# Altium PCB AmbientPro_Main_Board_V1.0.PcbDoc (part 3 of 5)
Units mm, origin at the board's own origin, x right, y up, seen from the top; angles counter-clockwise.
Board outline 100 x 100 mm, 4 copper layers (Top Layer, GND, PWR, Bottom Layer), stack 1.566 mm thick; 176 components, 124 nets, 570 pads, 283 vias.
Unrouted connection lines stored in the file: 133.
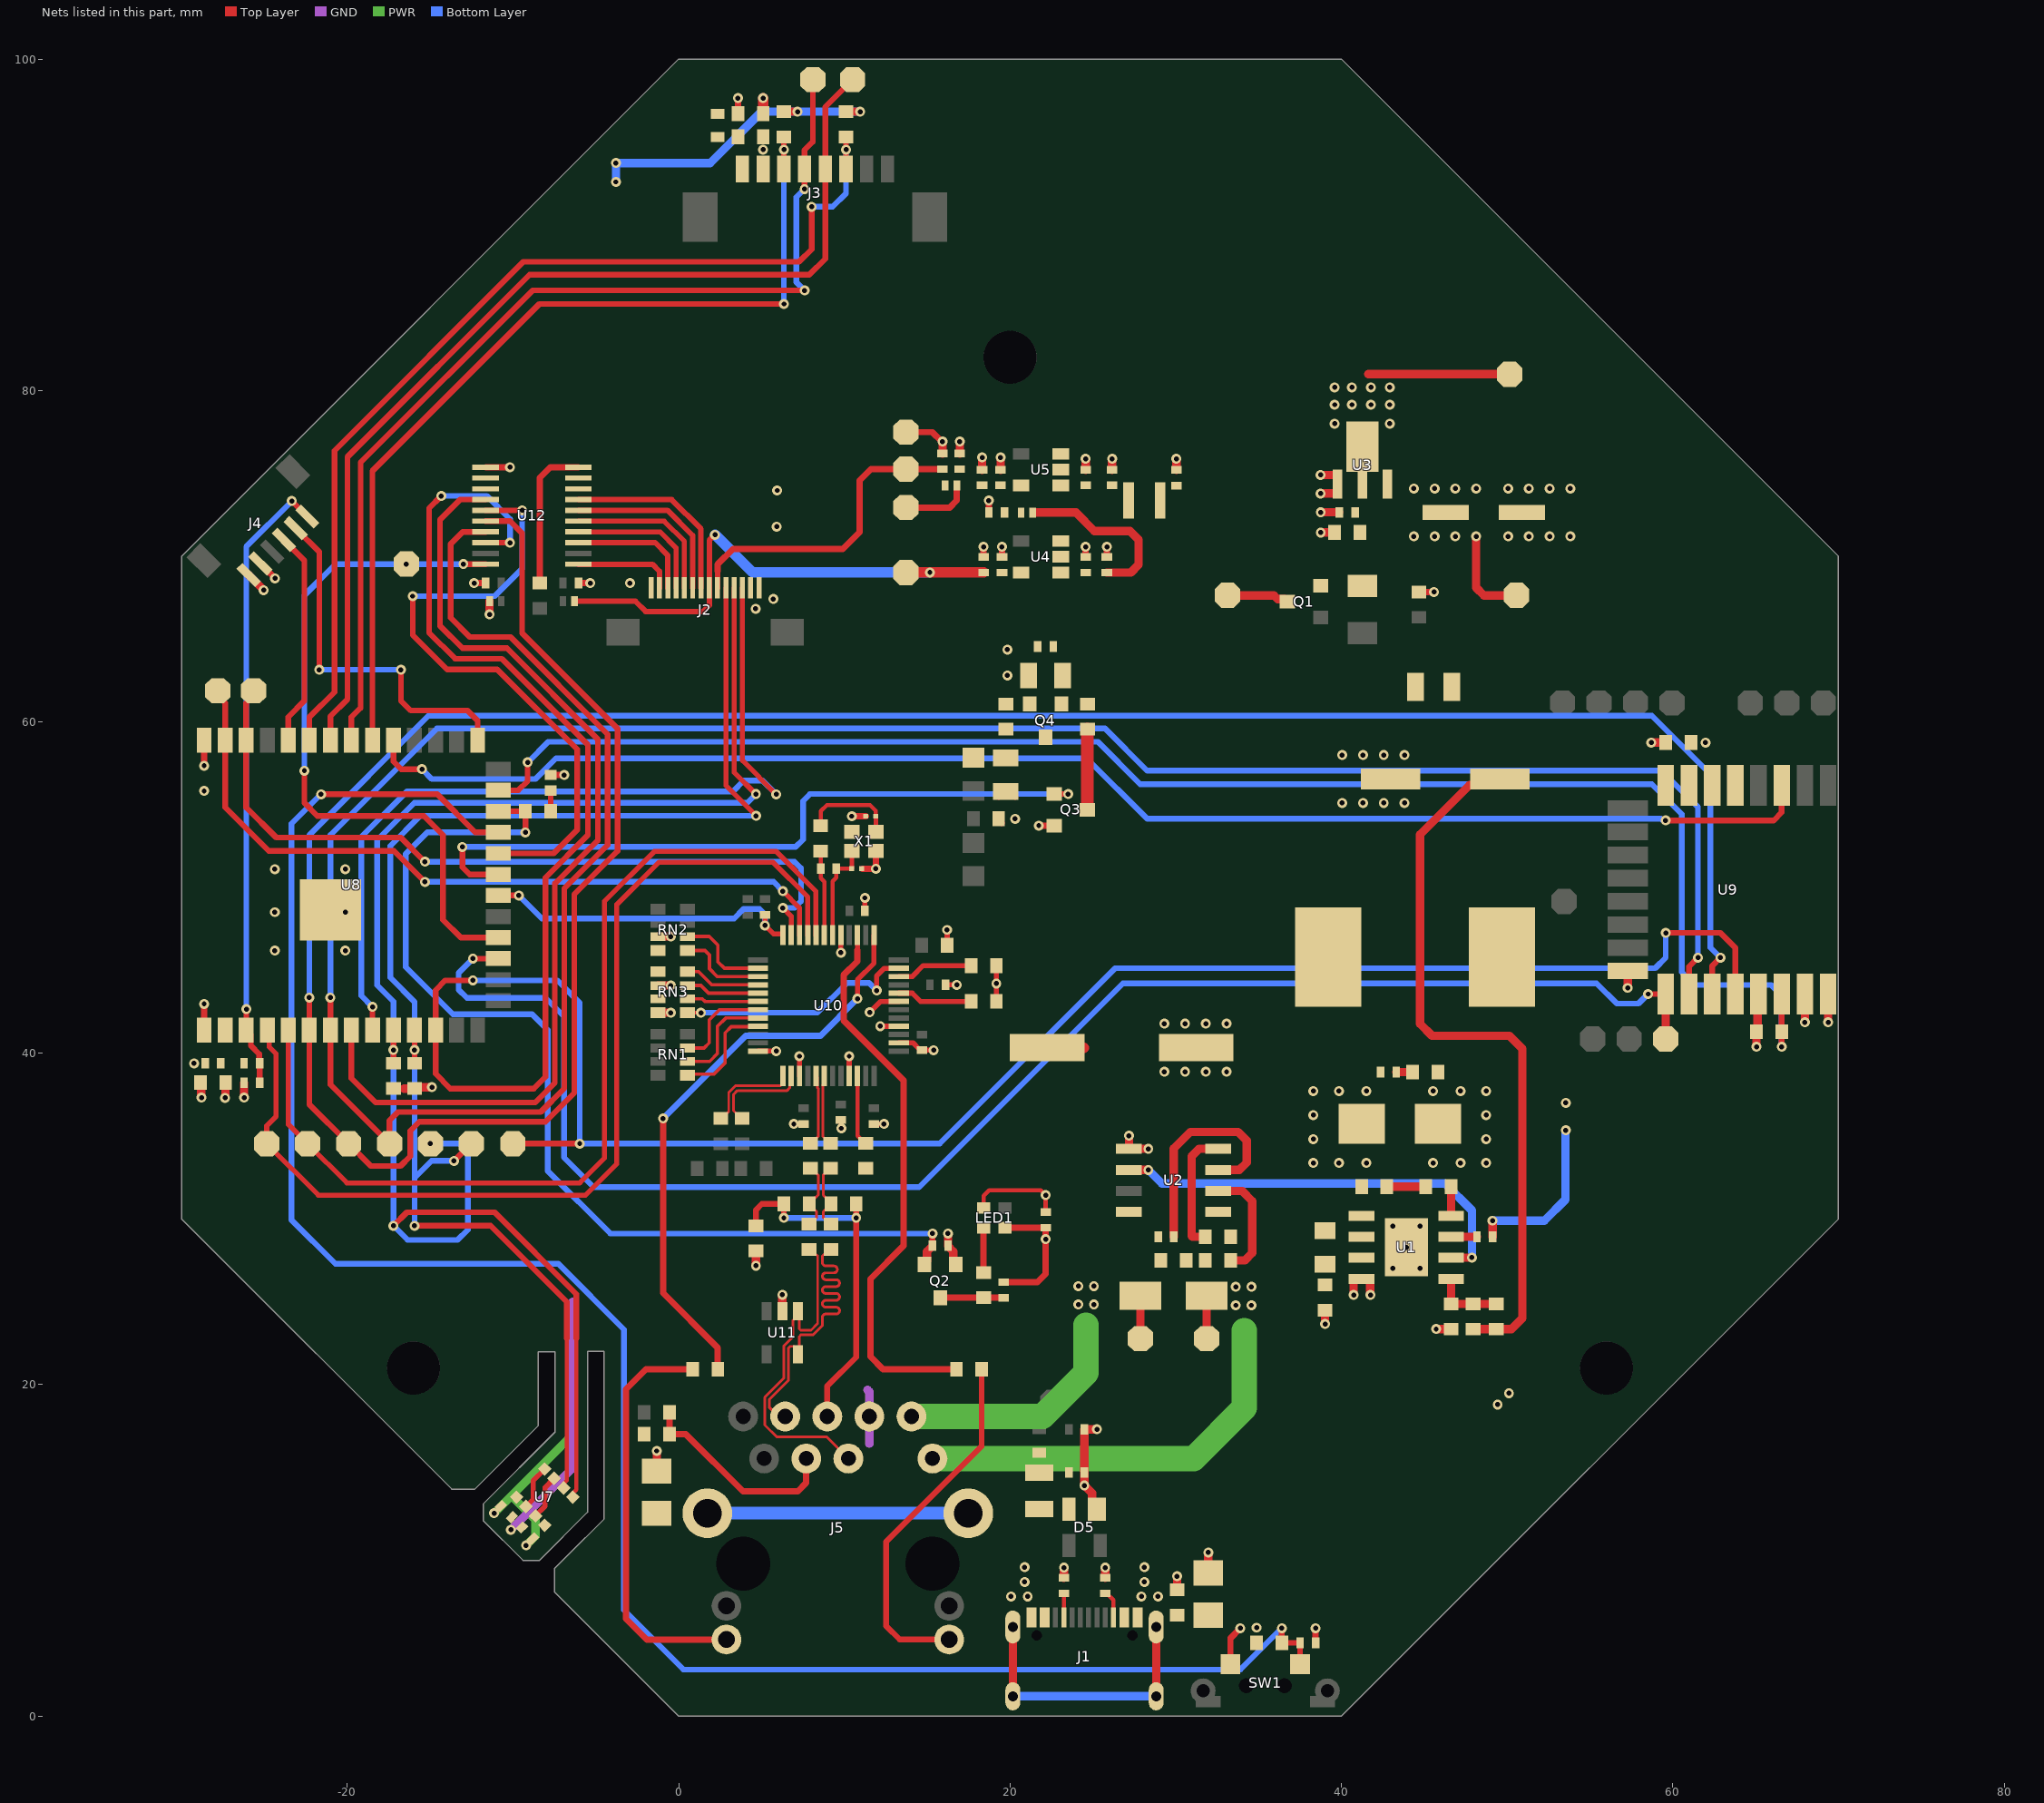
[diagram p4: the nets of this part, all layers, seen from the top]

## Part data (continued)
R9 R17 R18 R19 R27 R36 R38: library part RC0402FR-0710KL, "RES 10K OHM 1% 1/16W 0402", Case Code (Imperial)=0402, Case Code (Metric)=1005, LCSC Part Number=C60490, Manufacturer=Yageo, Max Operating Temperature=155°C, Max Power Dissipation=63mW, Min Operating Temperature=-55°C, Power Rating=62.5mW, Resistance=10kR, Resistance Tolerance=1%, Resistor Type="Thick Film", Supplier Part Number 1=603-RC0402FR-0710KL, Temperature Coefficient=100ppm/°C, Voltage Rating=50V, Case/Package=0402, Category="Chip SMD Resistors", ComponentLink1Description=https://datasheet.ciiva.com/7660/38568-7660787.pdf?src-supplier=Element14, ComponentLink1URL=https://datasheet.ciiva.com/7660/38568-7660787.pdf?src-supplier=Element14, ComponentLink2Description=https://datasheet.ciiva.com/7849/1686128-7849814.pdf?src-supplier=Element14, ComponentLink2URL=https://datasheet.ciiva.com/7849/1686128-7849814.pdf?src-supplier=Element14, ComponentLink3Description=https://datasheet.ciiva.com/7983/1018594-7983486.pdf?src-supplier=Element14, ComponentLink3URL=https://datasheet.ciiva.com/7983/1018594-7983486.pdf?src-supplier=Element14, ComponentLink4Description=https://datasheet.ciiva.com/22747/1018594-22747512.pdf?src-supplier=Element14, ComponentLink4URL=https://datasheet.ciiva.com/22747/1018594-22747512.pdf?src-supplier=Element14, ComponentLink5Description=https://datasheet.ciiva.com/12667/pyu-rc0402-51-rohs-l-6-r-12667067.pdf?src-supplier=Mouser, ComponentLink5URL=https://datasheet.ciiva.com/12667/pyu-rc0402-51-rohs-l-6-r-12667067.pdf?src-supplier=Mouser, ComponentLink6Description=https://datasheet.ciiva.com/7849/1784430-7849813.pdf?src-supplier=Element14, ComponentLink6URL=https://datasheet.ciiva.com/7849/1784430-7849813.pdf?src-supplier=Element14, ComponentLink7Description=https://datasheet.ciiva.com/7849/1784430-7849815.pdf?src-supplier=Element14, ComponentLink7URL=https://datasheet.ciiva.com/7849/1784430-7849815.pdf?src-supplier=Element14, Construction=Rectangular, Depth=0.5mm, Features="Moisture Resistant", Height=0.32mm, Item Type=Resistor, Lead Free="Lead Free", Lead Pitch=0.2mm, Length=1mm, Manufacturer Part Number=RC0402FR-0710KL, Military Standard=Not, Number of Pins=2, Number of Terminations=2, Packaging="Tape and Reel", Pricing 1="1=0.10000, 10=0.01400, 50=0.01400, 100=0.00500, 1000=0.00300, 10000=0.00200 (USD)", REACH SVHC="No SVHC", RoHS=Yes, RoHS Compliant=Yes, Series=RC, Stock 1=18648329, Supplier 1=Mouser, Termination=SMD/SMT, Tolerance=1%, Voltage Rating (DC)=50V, Width=0.5mm, Working Voltage=50V
R10 R25: library part RC0603JR-07100KL, "RES 100K OHM 5% 1/10W 0603", Case Code (Imperial)=0603, Case Code (Metric)=1608, LCSC Part Number=C100048, Manufacturer=Yageo, Max Operating Temperature=155°C, Max Power Dissipation=100mW, Min Operating Temperature=-55°C, Resistance=100kR, Resistance Tolerance=5%, Resistor Type="Thick Film", Supplier Part Number 1=311-100KGRCT-ND, Temperature Coefficient=100ppm/°C, Voltage Rating=50V, Case/Package=0603, Category="Chip SMD Resistors", ComponentLink1Description=https://datasheet.ciiva.com/7746/443971-7746424.pdf?src-supplier=Element14, ComponentLink1URL=https://datasheet.ciiva.com/7746/443971-7746424.pdf?src-supplier=Element14, ComponentLink2Description=https://datasheet.ciiva.com/7983/443971-7983686.pdf?src-supplier=Element14, ComponentLink2URL=https://datasheet.ciiva.com/7983/443971-7983686.pdf?src-supplier=Element14, ComponentLink3Description=https://datasheet.ciiva.com/7746/443971-7746423.pdf?src-supplier=Element14, ComponentLink3URL=https://datasheet.ciiva.com/7746/443971-7746423.pdf?src-supplier=Element14, ComponentLink4Description=https://datasheet.ciiva.com/8887/pyu-rc0603-51-rohs-l-4-8887903.pdf?src-supplier=Avnet, ComponentLink4URL=https://datasheet.ciiva.com/8887/pyu-rc0603-51-rohs-l-4-8887903.pdf?src-supplier=Avnet, Contact Plating=Tin,Matte, Features="Moisture Resistant", Item Type=Resistor, Lead Free="Lead Free", Manufacturer Part Number=RC0603JR-07100KL, Number of Pins=2, Number of Terminations=2, Packaging="Tape and Reel", Power Rating=100mW, Pricing 1="1=0.10000, 10=0.02000, 100=0.00800, 1000=0.00360, 2500=0.00312 (USD)", Radiation Hardening=No, REACH SVHC="No SVHC", RoHS=Yes, RoHS Compliant=Yes, Series=RC, Size Code=0603, Stock 1=1210037, Supplier 1=Digi-Key, Termination=SMD/SMT, Tolerance=5%, Voltage Rating (DC)=50V, Width=0.8mm
R11 R12: library part RC0402FR-075K1L, "RES 5.1K OHM 1% 1/16W 0402", Case Code (Imperial)=0402, Case Code (Metric)=1005, LCSC Part Number=C137973, Manufacturer=Yageo, Max Operating Temperature=155°C, Max Power Dissipation=63mW, Min Operating Temperature=-55°C, Package Quantity=1, Resistance=5.1kR, Resistance Tolerance=1%, Resistor Type="Thick Film", Temperature Coefficient=100ppm/°C, Voltage Rating=50V, Case/Package=0402, Category="Chip SMD Resistors", ComponentLink1Description=https://datasheet.ciiva.com/7983/1018594-7983519.pdf?src-supplier=Element14, ComponentLink1URL=https://datasheet.ciiva.com/7983/1018594-7983519.pdf?src-supplier=Element14, ComponentLink2Description=https://datasheet.ciiva.com/46394/1018594-46394936.pdf?src-supplier=Element14, ComponentLink2URL=https://datasheet.ciiva.com/46394/1018594-46394936.pdf?src-supplier=Element14, ComponentLink3Description=https://datasheet.ciiva.com/2453/pyu-r-int-thick-7-2453401.pdf?src-supplier=Digi-Key, ComponentLink3URL=https://datasheet.ciiva.com/2453/pyu-r-int-thick-7-2453401.pdf?src-supplier=Digi-Key, ComponentLink4Description=https://datasheet.ciiva.com/2453/pyu-r-int-thick-7-2453402.pdf?src-supplier=Digi-Key, ComponentLink4URL=https://datasheet.ciiva.com/2453/pyu-r-int-thick-7-2453402.pdf?src-supplier=Digi-Key, ComponentLink5Description=https://datasheet.ciiva.com/2453/pyu-r-int-thick-7-2453400.pdf?src-supplier=Digi-Key, ComponentLink5URL=https://datasheet.ciiva.com/2453/pyu-r-int-thick-7-2453400.pdf?src-supplier=Digi-Key, ComponentLink6Description=https://datasheet.ciiva.com/12558/pyu-rc0402-51-rohs-l-6-r-8721-12558460.pdf?src-supplier=Mouser, ComponentLink6URL=https://datasheet.ciiva.com/12558/pyu-rc0402-51-rohs-l-6-r-8721-12558460.pdf?src-supplier=Mouser, ComponentLink7Description=https://datasheet.ciiva.com/16744/pyu-rc0402-51-rohs-l-6-r-16744283.pdf?src-supplier=Future+Electronics, ComponentLink7URL=https://datasheet.ciiva.com/16744/pyu-rc0402-51-rohs-l-6-r-16744283.pdf?src-supplier=Future+Electronics, ComponentLink8Description=https://datasheet.ciiva.com/15189/getdatasheetpartid-323636-15189493.pdf?src-supplier=Verical, ComponentLink8URL=https://datasheet.ciiva.com/15189/getdatasheetpartid-323636-15189493.pdf?src-supplier=Verical, Construction=Rectangular, Depth=0.5mm, Features="Moisture Resistant", Height=0.016inch, Item Type=Resistor, Lead Free="Lead Free", Length=1mm, Manufacturer Part Number=RC0402FR-075K1L, Military Standard=Not, Number of Terminations=2, Packaging="Tape and Reel", Power Rating=63mW, Pricing 1="10000=0.00085 (USD)", RoHS=Yes, RoHS Compliant=Yes, Series=RC, Stock 1=65000, Supplier 1=Avnet, Supplier Part Number 1=RC0402FR-075K1L, Technology="THICK FILM", Termination=SMD/SMT, Tolerance=1%, Voltage Rating (DC)=50V, Width=0.02inch, Working Voltage=50V
R13: library part RC0603FR-071ML, "RES SMD 1M OHM 1% 1/10W 0603", Case Code (Imperial)=0603, Case Code (Metric)=1608, LCSC Part Number=C105578, Manufacturer=Yageo, Max Operating Temperature=155°C, Min Operating Temperature=-55°C, Package Quantity=5000, Power Rating=100mW, Resistance=1MR, Supplier Part Number 1=311-1.00MHRDKR-ND, Temperature Coefficient=100ppm/°C, Tolerance=1%, Voltage Rating=50V, Case/Package=0603, ComponentLink1Description=http://www.farnell.com/datasheets/2167052.pdf?src-supplier=Mouser, ComponentLink1URL=http://www.farnell.com/datasheets/2167052.pdf?src-supplier=Mouser, ComponentLink2Description=http://www.farnell.com/datasheets/2167052.pdf?src-supplier=Element14, ComponentLink2URL=http://www.farnell.com/datasheets/2167052.pdf?src-supplier=Element14, ComponentLink3Description=http://documents.rs-components.com/techlib://itc_doclist_GB.htm?stockno=5048956&src-supplier=RSComponents, ComponentLink3URL=http://documents.rs-components.com/techlib://itc_doclist_GB.htm?stockno=5048956&src-supplier=RSComponents, Composition="Thick Film", Depth=0.8mm, Height=0.45mm, Lead Free="Lead Free", Length=1.6mm, Manufacturer Part Number=RC0603FR-071ML, Military Standard=Not, Number of Pins=2, Packaging="Tape and Reel", Pricing 1="1=0.1, 10=0.023, 100=0.0094, 1000=0.00421, 2500=0.00366 (USD)", REACH SVHC="No SVHC", Stock 1=3824601, Supplier 1=Digi-Key, Termination=SMD/SMT, Voltage Rating (DC)=50V, Width=0.8mm
R14 R15 R21: library part RC0603FR-0710KL, "RES SMD 10K Ohm 1% 1/10W 0603", Case Code (Imperial)=0603, Case Code (Metric)=1608, LCSC Part Number=C98220, Manufacturer=Yageo, Max Operating Temperature=155°C, Max Power Dissipation=100mW, Min Operating Temperature=-55°C, Resistance=10kR, Resistance Tolerance=1%, Resistor Type="Thick Film", Supplier Part Number 1=311-10.0KHRCT-ND, Temperature Coefficient=100ppm/°C, Voltage Rating=75V, Voltage Rating (DC)=50V, Case/Package=0603, Category="Chip SMD Resistors", ComponentLink1Description=https://datasheet.ciiva.com/7660/38590-7660789.pdf?src-supplier=Element14, ComponentLink1URL=https://datasheet.ciiva.com/7660/38590-7660789.pdf?src-supplier=Element14, ComponentLink2Description=https://datasheet.ciiva.com/7983/443971-7983596.pdf?src-supplier=Element14, ComponentLink2URL=https://datasheet.ciiva.com/7983/443971-7983596.pdf?src-supplier=Element14, ComponentLink3Description=https://datasheet.ciiva.com/22747/443971-22747519.pdf?src-supplier=Element14, ComponentLink3URL=https://datasheet.ciiva.com/22747/443971-22747519.pdf?src-supplier=Element14, ComponentLink4Description=https://datasheet.ciiva.com/46440/1868787-46440891.pdf?src-supplier=Element14, ComponentLink4URL=https://datasheet.ciiva.com/46440/1868787-46440891.pdf?src-supplier=Element14, ComponentLink5Description=https://datasheet.ciiva.com/7746/1738695-7746239.pdf?src-supplier=Element14, ComponentLink5URL=https://datasheet.ciiva.com/7746/1738695-7746239.pdf?src-supplier=Element14, ComponentLink6Description=https://datasheet.ciiva.com/15189/getdatasheetpartid-409289-15189591.pdf?src-supplier=Verical, ComponentLink6URL=https://datasheet.ciiva.com/15189/getdatasheetpartid-409289-15189591.pdf?src-supplier=Verical, Construction=Rectangular, Depth=0.8mm, Features="Moisture Resistant", Height=0.45mm, Item Type=Resistor, Lead Free="Lead Free", Lead Pitch=0.3mm, Length=1.6mm, Manufacturer Part Number=RC0603FR-0710KL, Military Standard=Not, Number of Pins=2, Number of Terminations=2, Packaging="Tape and Reel", Power Rating=100mW, Pricing 1="1=0.10000, 10=0.02400, 100=0.00970, 1000=0.00436, 2500=0.00378 (USD)", REACH SVHC=Unknown, RoHS=Yes, RoHS Compliant=Yes, Series=RC, Size Code=0603, Stock 1=25249139, Supplier 1=Digi-Key, Termination=SMD/SMT, Tolerance=1%, Weight=7.1E-05oz, Width=0.8mm
R16: library part RC0402FR-0722RL, "RES 22 OHM 1% 1/16W 0402", Case Code (Imperial)=0402, Case Code (Metric)=1005, LCSC Part Number=C114765, Manufacturer=Yageo, Max Operating Temperature=155°C, Max Power Dissipation=63mW, Min Operating Temperature=-55°C, Power Rating=62.5mW, Resistance=22R, Resistance Tolerance=1%, Resistor Type="Thick Film", Temperature Coefficient=100ppm/°C, Voltage Rating=50V, Case/Package=0402, Category="Chip SMD Resistors", ComponentLink1Description=https://datasheet.ciiva.com/11819/0900766b80c66297-11819462.pdf?src-supplier=RSComponents, ComponentLink1URL=https://datasheet.ciiva.com/11819/0900766b80c66297-11819462.pdf?src-supplier=RSComponents, ComponentLink2Description=https://datasheet.ciiva.com/7849/1018594-7849912.pdf?src-supplier=Element14, ComponentLink2URL=https://datasheet.ciiva.com/7849/1018594-7849912.pdf?src-supplier=Element14, ComponentLink3Description=https://datasheet.ciiva.com/7849/1018594-7849911.pdf?src-supplier=Element14, ComponentLink3URL=https://datasheet.ciiva.com/7849/1018594-7849911.pdf?src-supplier=Element14, ComponentLink4Description=https://datasheet.ciiva.com/16930/pyu-rc0402-51-rohs-l-6-r-16930687.pdf?src-supplier=Future+Electronics, ComponentLink4URL=https://datasheet.ciiva.com/16930/pyu-rc0402-51-rohs-l-6-r-16930687.pdf?src-supplier=Future+Electronics, ComponentLink5Description=https://datasheet.ciiva.com/26829/getdatasheetpartid-554995-26829991.pdf?src-supplier=Verical, ComponentLink5URL=https://datasheet.ciiva.com/26829/getdatasheetpartid-554995-26829991.pdf?src-supplier=Verical, Construction=Rectangular, Depth=0.5mm, Features="Moisture Resistant", Height=0.32mm, Item Type=Resistor, Lead Free="Lead Free", Length=1mm, Manufacturer Part Number=RC0402FR-0722RL, Military Standard=Not, Number of Pins=2, Number of Terminations=2, Packaging="Tape and Reel", Pricing 1="10000=0.00085 (USD)", Reach SVHC Compliant=Yes, RoHS=Yes, RoHS Compliant=Yes, Series=RC, Size Code=0402, Stock 1=1810000, Supplier 1=Avnet, Supplier Part Number 1=RC0402FR-0722RL, Technology="THICK FILM", Termination=SMD/SMT, Tolerance=1%, Voltage Rating (DC)=50V, Width=0.5mm
R20 R22 R26: library part RC0603FR-071KL, "RES SMD 1K OHM 1% 1/10W 0603", Case Code (Imperial)=0603, Case Code (Metric)=1608, LCSC Part Number=C22548, Manufacturer=Yageo, Max Operating Temperature=155°C, Min Operating Temperature=-55°C, Power Rating=100mW, Resistance=1kR, Supplier Part Number 1=311-1.00KHRDKR-ND, Temperature Coefficient=100ppm/°C, Tolerance=1%, Voltage Rating=50V, Case/Package=0603, ComponentLink1Description=https://www.verical.com/server-webapp/html/getDatasheet?partID=409289&src-supplier=Verical, ComponentLink1URL=https://www.verical.com/server-webapp/html/getDatasheet?partID=409289&src-supplier=Verical, ComponentLink2Description=http://documents.rs-components.com/techlib://itc_doclist_GB.htm?stockno=5048928&src-supplier=RSComponents, ComponentLink2URL=http://documents.rs-components.com/techlib://itc_doclist_GB.htm?stockno=5048928&src-supplier=RSComponents, ComponentLink3Description=http://www.yageo.com/documents/recent/PYu-RC0603_51_RoHS_L_4.pdf?src-supplier=Avnet+Europe, ComponentLink3URL=http://www.yageo.com/documents/recent/PYu-RC0603_51_RoHS_L_4.pdf?src-supplier=Avnet+Europe, ComponentLink4Description=http://www.farnell.com/datasheets/2167052.pdf?src-supplier=Element14, ComponentLink4URL=http://www.farnell.com/datasheets/2167052.pdf?src-supplier=Element14, ComponentLink5Description=http://www.farnell.com/datasheets/1868787.pdf?src-supplier=Element14, ComponentLink5URL=http://www.farnell.com/datasheets/1868787.pdf?src-supplier=Element14, ComponentLink6Description=http://www.yageo.com/documents/recent/PYu-RC_Group_51_RoHS_L_2.pdf?src-supplier=Avnet, ComponentLink6URL=http://www.yageo.com/documents/recent/PYu-RC_Group_51_RoHS_L_2.pdf?src-supplier=Avnet, ComponentLink7Description=https://www.verical.com/server-webapp/html/getDatasheet?partID=404327&src-supplier=Verical, ComponentLink7URL=https://www.verical.com/server-webapp/html/getDatasheet?partID=404327&src-supplier=Verical, ComponentLink8Description=http://www.farnell.com/datasheets/443971.pdf?src-supplier=Element14, ComponentLink8URL=http://www.farnell.com/datasheets/443971.pdf?src-supplier=Element14, Composition="Thick Film", Contact Plating=Tin,Matte, Depth=0.8mm, Height=0.45mm, Item Type=Resistor, Lead Free="Lead Free", Length=1.6mm, Manufacturer Part Number=RC0603FR-071KL, Military Standard=Not, Packaging="Tape and Reel", Pricing 1="1=0.1, 10=0.023, 100=0.0094, 1000=0.0042, 2500=0.0037 (USD)", Radiation Hardening=No, REACH SVHC="No SVHC", Stock 1=21472395, Supplier 1=Digi-Key, Termination=SMD/SMT
R28 R42 R45: library part RC0603FR-070RL, "RES SMD 0R, 1%, 0.1W, 0603", LCSC Part Number=C100044, Manufacturer=Yageo, Package=0603, ComponentLink9Description=LCSC, ComponentLink9URL=https://www.lcsc.com/product-detail/Chip-Resistor-Surface-Mount_YAGEO-RC0603FR-070RL_C100044.html, Item Type=Resistor, Manufacturer Part Number=RC0603FR-070RL
R29 R30 R31 R34: library part RC0603FR-0733RL, "RES SMD 0603 33 Ohm 1% 1/10W", Case Code (Imperial)=0603, Case Code (Metric)=1608, LCSC Part Number=C108661, Manufacturer=Yageo, Max Operating Temperature=155°C, Max Power Dissipation=100mW, Min Operating Temperature=-55°C, Package Quantity=1, Resistance Tolerance=1%, Resistor Type="Thick Film", Supplier Part Number 1=311-33.0HRCT-ND, Temperature Coefficient=100ppm/°C, Voltage Rating=75V, Voltage Rating (DC)=50V, Case/Package=0603, Category="Chip SMD Resistors", ComponentLink1Description=https://datasheet.ciiva.com/11808/0900766b80f96399-11808741.pdf?src-supplier=RSComponents, ComponentLink1URL=https://datasheet.ciiva.com/11808/0900766b80f96399-11808741.pdf?src-supplier=RSComponents, ComponentLink2Description=https://datasheet.ciiva.com/2453/pyu-r-int-thick-7-2453952.pdf?src-supplier=Digi-Key, ComponentLink2URL=https://datasheet.ciiva.com/2453/pyu-r-int-thick-7-2453952.pdf?src-supplier=Digi-Key, ComponentLink3Description=https://datasheet.ciiva.com/2453/pyu-r-int-thick-7-2453953.pdf?src-supplier=Digi-Key, ComponentLink3URL=https://datasheet.ciiva.com/2453/pyu-r-int-thick-7-2453953.pdf?src-supplier=Digi-Key, ComponentLink4Description=https://datasheet.ciiva.com/2453/pyu-r-int-thick-7-2453954.pdf?src-supplier=Digi-Key, ComponentLink4URL=https://datasheet.ciiva.com/2453/pyu-r-int-thick-7-2453954.pdf?src-supplier=Digi-Key, ComponentLink5Description=https://datasheet.ciiva.com/7660/38590-7660792.pdf?src-supplier=Element14, ComponentLink5URL=https://datasheet.ciiva.com/7660/38590-7660792.pdf?src-supplier=Element14, ComponentLink6Description=https://datasheet.ciiva.com/15189/getdatasheetpartid-326673-15189708.pdf?src-supplier=Verical, ComponentLink6URL=https://datasheet.ciiva.com/15189/getdatasheetpartid-326673-15189708.pdf?src-supplier=Verical, ComponentLink7Description=https://datasheet.ciiva.com/7746/443971-7746334.pdf?src-supplier=Element14, ComponentLink7URL=https://datasheet.ciiva.com/7746/443971-7746334.pdf?src-supplier=Element14, ComponentLink8Description=https://datasheet.ciiva.com/7746/443971-7746335.pdf?src-supplier=Element14, ComponentLink8URL=https://datasheet.ciiva.com/7746/443971-7746335.pdf?src-supplier=Element14, ComponentLink9Description=https://datasheet.ciiva.com/46395/443971-46395007.pdf?src-supplier=Element14, ComponentLink9URL=https://datasheet.ciiva.com/46395/443971-46395007.pdf?src-supplier=Element14, Construction=Rectangular, Depth=0.8mm, Features="Moisture Resistant", Height=0.45mm, Item Type=Resistor, Lead Free="Lead Free", Lead Pitch=0.3mm, Length=1.6mm, Manufacturer Part Number=RC0603FR-0733RL, Military Standard=Not, Number of Pins=2, Number of Terminations=2, Packaging="Tape and Reel", Power Rating=100mW, Pricing 1="1=0.10000, 10=0.02400, 100=0.00970, 1000=0.00436, 2500=0.00378 (USD)", REACH SVHC="No SVHC", Resistance=33R, RoHS=Yes, RoHS Compliant=Yes, Series=RC, Size Code=0603, Stock 1=41, Supplier 1=Digi-Key, Technology="THICK FILM", Termination=SMD/SMT, Tolerance=1%, Weight=7.1E-05oz, Width=0.8mm
R32 R33 R35 R37: library part RC0603FR-0749R9L, "RES 49.9 OHM 1% 1/10W 0603", Case Code (Imperial)=0603, Case Code (Metric)=1608, LCSC Part Number=C114625, Manufacturer=Yageo, Max Operating Temperature=155°C, Max Power Dissipation=100mW, Min Operating Temperature=-55°C, Resistance Tolerance=1%, Resistor Type="Thick Film", Temperature Coefficient=100ppm/°C, Voltage Rating=50V, Case/Package=0603, Category="Chip SMD Resistors", ComponentLink1Description=https://datasheet.ciiva.com/11808/0900766b80f96399-11808223.pdf?src-supplier=RSComponents, ComponentLink1URL=https://datasheet.ciiva.com/11808/0900766b80f96399-11808223.pdf?src-supplier=RSComponents, ComponentLink2Description=https://datasheet.ciiva.com/22747/443971-22747527.pdf?src-supplier=Element14, ComponentLink2URL=https://datasheet.ciiva.com/22747/443971-22747527.pdf?src-supplier=Element14, ComponentLink3Description=https://datasheet.ciiva.com/15189/getdatasheetpartid-325421-15189750.pdf?src-supplier=Verical, ComponentLink3URL=https://datasheet.ciiva.com/15189/getdatasheetpartid-325421-15189750.pdf?src-supplier=Verical, Construction=Rectangular, Depth=0.8mm, Features="Moisture Resistant", Height=0.45mm, Item Type=Resistor, Lead Free="Lead Free", Length=1.6mm, Manufacturer Part Number=RC0603FR-0749R9L, Military Standard=Not, Number of Pins=2, Number of Terminations=2, Packaging="Tape and Reel", Power Rating=100mW, Pricing 1="5000=0.00280 (USD)", REACH SVHC="No SVHC", Resistance=49.9R, RoHS=Yes, RoHS Compliant=Yes, Series=RC, Size Code=0603, Stock 1=2075000, Supplier 1="Arrow Electronics", Supplier Part Number 1=RC0603FR-0749R9L, Technology="THICK FILM", Termination=SMD/SMT, Tolerance=1%, Voltage Rating (DC)=50V
R39: library part RC0603FR-0710RL, "RES SMD 10 OHM 1% 1/10W 0603", Case Code (Imperial)=0603, Case Code (Metric)=1608, LCSC Part Number=C109318, Manufacturer=Yageo, Max Operating Temperature=155°C, Min Operating Temperature=-55°C, Power Rating=100mW, Supplier Part Number 1=311-10.0HRDKR-ND, Temperature Coefficient=200ppm/°C, Tolerance=1%, Voltage Rating=50V, Case/Package=0603, ComponentLink1Description=http://www.farnell.com/datasheets/1868787.pdf?src-supplier=Element14, ComponentLink1URL=http://www.farnell.com/datasheets/1868787.pdf?src-supplier=Element14, ComponentLink2Description=http://www.yageo.com/documents/recent/PYu-RC0603_51_RoHS_L_4.pdf?src-supplier=Avnet, ComponentLink2URL=http://www.yageo.com/documents/recent/PYu-RC0603_51_RoHS_L_4.pdf?src-supplier=Avnet, ComponentLink3Description=http://documents.rs-components.com/techlib://itc_doclist_GB.htm?stockno=5048984&src-supplier=RSComponents, ComponentLink3URL=http://documents.rs-components.com/techlib://itc_doclist_GB.htm?stockno=5048984&src-supplier=RSComponents, ComponentLink4Description=http://www.yageo.com/documents/recent/PYu-RC0603_51_RoHS_L_4.pdf?src-supplier=Avnet+Europe, ComponentLink4URL=http://www.yageo.com/documents/recent/PYu-RC0603_51_RoHS_L_4.pdf?src-supplier=Avnet+Europe, Composition="Thick Film", Contact Plating=Tin,Matte, Depth=0.8mm, Height=0.45mm, Item Type=Resistor, Lead Free="Lead Free", Length=1.6mm, Manufacturer Part Number=RC0603FR-0710RL, Military Standard=Not, Number of Pins=2, Packaging="Tape and Reel", Pricing 1="1=0.1, 10=0.046, 100=0.0187, 1000=0.0084, 2500=0.00729 (USD)", Radiation Hardening=No, REACH SVHC="No SVHC", Resistance=10R, Stock 1=10836596, Supplier 1=Digi-Key, Termination=SMD/SMT, Voltage Rating (DC)=50V, Width=0.8mm
R40: library part RK73H1ETTP1004F, "Res Thick Film 0402 1M Ohm 1% 0.1W(1/10W) ±100ppm/C Pad SMD Automotive T/R", Case Code (Imperial)=0402, Case Code (Metric)=1005, LCSC Part Number=C159943, Manufacturer="KOA Speer", Max Operating Temperature=155°C, Max Power Dissipation=100mW, Min Operating Temperature=-55°C, Package Quantity=10000, Power Rating=63mW, Ratings=AEC-Q200, Resistance=1MR, Temperature Coefficient=100ppm/°C, Tolerance=1%, Voltage Rating=50V, Case/Package=0402, Category="Chip SMD Resistors", ComponentLink1Description=http://www.jameco.com/Jameco/Products/ProdDS/1882463.pdf?src-supplier=Jameco, ComponentLink1URL=http://www.jameco.com/Jameco/Products/ProdDS/1882463.pdf?src-supplier=Jameco, ComponentLink2Description=http://components.arrow.com/part/dataview/39721833S6492602N5146?src-supplier=Arrow+Electronics, ComponentLink2URL=http://components.arrow.com/part/dataview/39721833S6492602N5146?src-supplier=Arrow+Electronics, ComponentLink3Description=https://datasheet.octopart.com/RK73H1ETTP1004F-KOA-Speer-datasheet-149653815.pdf?src-supplier=Farnell, ComponentLink3URL=https://datasheet.octopart.com/RK73H1ETTP1004F-KOA-Speer-datasheet-149653815.pdf?src-supplier=Farnell, ComponentLink4Description=http://www.koaspeer.com/catimages/Products/RK73H/RK73H.pdf?src-supplier=Mouser, ComponentLink4URL=http://www.koaspeer.com/catimages/Products/RK73H/RK73H.pdf?src-supplier=Mouser, ComponentLink5Description=https://www.verical.com/server-webapp/html/getDatasheet?partID=139303&src-supplier=Verical, ComponentLink5URL=https://www.verical.com/server-webapp/html/getDatasheet?partID=139303&src-supplier=Verical, Construction=Rectangular, Depth=0.5mm, Features="Moisture Resistant,Automotive AEC-Q200", Height=0.35mm, Item Type=Resistor, Lead Free=5697LeadFree, Length=1mm, Manufacturer Part Number=RK73H1ETTP1004F, Military Standard=Not, Mount="Surface Mount", Number of Terminations=2, Packaging="Tape and Reel", Pricing 1="100=0.003, 1000=0.006, 2500=0.005, 5000=0.005, 10000=0.004 (GBP)", RoHS=Yes, RoHS Compliant=Yes, Series=RK73H, Stock 1=29500, Supplier 1=Rs, Technology="THICK FILM", Termination=SMD/SMT, Voltage Rating (DC)=50V, Width=0.5mm
R41 R43: library part RC0603JR-07330RL, "RES  SMD 330R 100 mW 0603", Case Code (Imperial)=0603, Case Code (Metric)=1608, LCSC Part Number=C105879, Manufacturer=Yageo, Max Operating Temperature=155°C, Max Power Dissipation=100mW, Min Operating Temperature=-55°C, Package Quantity=5000, Resistance Tolerance=5%, Resistor Type="Thick Film", Supplier Part Number 1=311-330GRCT-ND, Temperature Coefficient=100ppm/°C, Voltage Rating=50V, Case/Package=0603, Category="Chip SMD Resistors", Construction=Rectangular, Depth=0.8mm, Features="Moisture Resistant", Height=0.45mm, Item Type=Resistor, Lead Free="Lead Free", Length=1.6mm, Manufacturer Part Number=RC0603JR-07330RL, Military Standard=Not, Number of Pins=2, Number of Terminations=2, Packaging="Tape and Reel", Power Rating=100mW, Pricing 1="1=0.10000, 10=0.02000, 100=0.00800, 1000=0.00360, 2500=0.00312 (USD)", REACH SVHC="No SVHC", Resistance=330R, RoHS=Yes, RoHS Compliant=Yes, Series=RC, Size Code=0603, Stock 1=1074593, Supplier 1=Digi-Key, Termination=SMD/SMT, Tolerance=5%, Voltage Rating (DC)=50V, Width=0.8mm
R44: library part RC0603FR-0712K4L, "RES SMD 12.4K OHM 1% 1/10W 0603", Case Code (Imperial)=0603, Case Code (Metric)=1608, LCSC Part Number=C137798, Manufacturer=Yageo, Max Operating Temperature=155°C, Max Power Dissipation=100mW, Min Operating Temperature=-55°C, Package Quantity=1, Resistance=12.4kR, Resistor Type="Thick Film", Supplier Part Number 1=311-12.4KHRCT-ND, Temperature Coefficient=100ppm/°C, Tolerance=1%, Voltage Rating=50V, Working Voltage=75V, Case/Package=0603, Category="Chip SMD Resistors", ComponentLink1Description=https://datasheet.ciiva.com/2454/pyu-r-int-thick-7-2454069.pdf?src-supplier=Digi-Key, ComponentLink1URL=https://datasheet.ciiva.com/2454/pyu-r-int-thick-7-2454069.pdf?src-supplier=Digi-Key, ComponentLink2Description=https://datasheet.ciiva.com/2454/pyu-r-int-thick-7-2454070.pdf?src-supplier=Digi-Key, ComponentLink2URL=https://datasheet.ciiva.com/2454/pyu-r-int-thick-7-2454070.pdf?src-supplier=Digi-Key, ComponentLink3Description=https://datasheet.ciiva.com/2454/pyu-r-int-thick-7-2454071.pdf?src-supplier=Digi-Key, ComponentLink3URL=https://datasheet.ciiva.com/2454/pyu-r-int-thick-7-2454071.pdf?src-supplier=Digi-Key, Construction=Rectangular, Depth=0.8mm, Features="Moisture Resistant", Height=0.022inch, Lead Free="Lead Free", Length=0.063inch, Manufacturer Part Number=RC0603FR-0712K4L, Military Standard=Not, Number of Terminations=2, Packaging="Tape and Reel", Power Rating=100mW, Pricing 1="1=0.10000, 10=0.02400, 100=0.00970, 1000=0.00436, 2500=0.00378 (USD)", RoHS=Yes, RoHS Compliant=Yes, Series=RC, Stock 1=494008, Supplier 1=Digi-Key, Technology="THICK FILM", Termination=SMD/SMT, Voltage Rating (DC)=50V, Width=0.031inch
RN1 RN2 RN3: library part YC164-FR-0710KL, "RES ARRAY 4 RES 10K OHM 1206", Case Code (Imperial)=1206, Case Code (Metric)=3216, LCSC Part Number=C110924, Manufacturer=Yageo, Max Operating Temperature=155°C, Min Operating Temperature=-55°C, Number of Resistors=4, Power Per Element=62.5mW, Resistance Tolerance=1%, Supplier Part Number 1=5054288, Temperature Coefficient=200ppm/°C, Voltage Rating=50V, Category="Resistor Arrays", Circuit Type=Isolated, ComponentLink1Description=http://www.farnell.com/datasheets/2167431.pdf?src-supplier=Farnell, ComponentLink1URL=http://www.farnell.com/datasheets/2167431.pdf?src-supplier=Farnell, ComponentLink2Description=https://media.digikey.com/pdf/Data%20Sheets/Yageo%20PDFs/YC102-358,TC122-164_Series_DS.pdf?src-supplier=Digi-Key, ComponentLink2URL=https://media.digikey.com/pdf/Data%20Sheets/Yageo%20PDFs/YC102-358,TC122-164_Series_DS.pdf?src-supplier=Digi-Key, ComponentLink3Description=http://www.farnell.com/datasheets/2167431.pdf?src-supplier=Element14, ComponentLink3URL=http://www.farnell.com/datasheets/2167431.pdf?src-supplier=Element14, ComponentLink4Description=http://www.farnell.com/datasheets/443424.pdf?src-supplier=Element14, ComponentLink4URL=http://www.farnell.com/datasheets/443424.pdf?src-supplier=Element14, ComponentLink5Description=http://www.farnell.com/datasheets/2167431.pdf?src-supplier=Newark, ComponentLink5URL=http://www.farnell.com/datasheets/2167431.pdf?src-supplier=Newark, Height=0.028inch, Item Type="Resistor Array", Lead Free="Lead Free", Length=0.126inch, Manufacturer Part Number=YC164-FR-0710KL, Mounting Technology="Surface Mount", Number of Circuits=4, Number of Elements=4, Packaging="Tape and Reel", Pins=8, Pricing 1="5000=0.0101, 20000=0.0095, 50000=0.0092, 125000=0.0089, 200000=0.0085 (USD)", Reach SVHC Compliant=Unknown, RoHS=Yes, RoHS Compliant=Yes, Series=YC164, Stock 1=25000, Supplier 1="Future Electronics", Tolerance=1%, Width=0.063inch
SW1: "3.5mm 3.5mm SMDSplicing Black Rectangle button 50mA Surface Mount 7mm SPST 100MΩ 20000 12V 250gf@±50gf SMD Tactile Switches ROHS", LCSC Part Number=C2910695, Manufacturer=YIYUAN, Package=Custom, ComponentLink1Description=LCSC, ComponentLink1URL=https://lcsc.com/product-detail/Tactile-Switches_YIYUAN-YTS-B003-2A_C2910695.html, Item Type="Tactile Switch", Manufacturer Part Number=YTS-B003-2A
U1: "Step-down type SOIC-8-EP DC-DC Converters ROHS", LCSC Part Number=C329267, Manufacturer=XDS, Package=SOIC-8-EP, ComponentLink1Description=LCSC, ComponentLink1URL=https://www.lcsc.com/product-detail/DC-DC-Converters_XDS-TX4138_C329267.html, Item Type=IC, Manufacturer Part Number=TX4138
U2: "IC POE CNTRL 1 CHANNEL 8SOIC", Case/Package=D, LCSC Part Number=C2867397, Manufacturer="Texas Instruments", Max Operating Temperature=85°C, Max Power Dissipation=12.95W, Max Supply Voltage=57V, Min Current Limit=405mA, Min Operating Temperature=-40°C, Min Supply Voltage=0V, Operating Supply Current=240uA, Output Current=450mA, Package Quantity=2500, Power Dissipation=13W, Supplier Part Number 1=595-TPS2375DR, Category="Interface ICs", ComponentLink1Description=https://datasheet.ciiva.com/1943/tps2375-1943071.pdf?src-supplier=Digi-Key, ComponentLink1URL=https://datasheet.ciiva.com/1943/tps2375-1943071.pdf?src-supplier=Digi-Key, ComponentLink2Description=https://datasheet.ciiva.com/1943/tps2375-1943070.pdf?src-supplier=Digi-Key, ComponentLink2URL=https://datasheet.ciiva.com/1943/tps2375-1943070.pdf?src-supplier=Digi-Key, ComponentLink3Description=https://datasheet.ciiva.com/1943/tps2375-1943072.pdf?src-supplier=Digi-Key, ComponentLink3URL=https://datasheet.ciiva.com/1943/tps2375-1943072.pdf?src-supplier=Digi-Key, ComponentLink4Description=https://datasheet.ciiva.com/14248/tps2375-14248055.pdf?src-supplier=Avnet, ComponentLink4URL=https://datasheet.ciiva.com/14248/tps2375-14248055.pdf?src-supplier=Avnet, Height=1.58mm, Item Type=IC, Lead Free="Lead Free", Length=5mm, Manufacturer Part Number=TPS2375DR, Number of Channels=1, Packaging="Tape and Reel", Pins=8, Pricing 1="1=2.94, 10=2.65, 50=2.5, 100=2.13, 1000=1.45, 10000=1.29 (USD)", Radiation Hardening=No, RoHS=Yes, RoHS Compliant=Yes, Series=-, Stock 1=12566, Supplier 1=Mouser, Weight=0.002561oz
U3: "600mA 60dB 500mV@(600mA) Fixed 3.3V~3.3V Positive 1 7V SOT-89(SOT-89-3) Linear Voltage Regulators (LDO) ROHS", LCSC Part Number=C171498, Manufacturer="UTC(Unisonic Tech)", Package=SOT-89(SOT-89-3), ComponentLink1Description=LCSC, ComponentLink1URL=https://lcsc.com/product-detail/Linear-Voltage-Regulators-LDO_UTC-Unisonic-Tech-LR1107G-33-AB3-C-R_C171498.html, Item Type=IC, Manufacturer Part Number=LR1107G-33-AB3-C-R
U4: "300mA 80dB@(1kHz) 410mV@(300mA) Fixed 1.8V~1.8V Positive 1 5.5V SOT-25-5 Linear Voltage Regulators (LDO) ROHS", LCSC Part Number=C216644, Manufacturer="Torex Semicon", Package=SOT-25-5, ComponentLink1Description=LCSC, ComponentLink1URL=https://www.lcsc.com/product-detail/Linear-Voltage-Regulators-LDO_Torex-Semicon-XC6228D182VR-G_C216644.html, Item Type=IC, Manufacturer Part Number=XC6228D182VR-G
U5: "300mA 80dB@(1kHz) 305mV@(300mA) Fixed 3.3V~3.3V Positive 1 5.5V SOT-25-5 Linear Voltage Regulators (LDO) ROHS", LCSC Part Number=C69841, Manufacturer="Torex Semicon", Package=SOT-25-5, ComponentLink1Description=LCSC, ComponentLink1URL=https://www.lcsc.com/product-detail/Linear-Voltage-Regulators-LDO_Torex-Semicon-XC6228D332VR-G_C69841.html, Item Type=IC, Manufacturer Part Number=XC6228D332VR-G
U7: "SENSOR RH PRESSURE TEMP VOC", LCSC Part Number=C125972, Manufacturer="Bosch Sensortec", Max Operating Temperature=85°C, Min Operating Temperature=-40°C, Supplier Part Number 1=7107186, Category=Uncategorized, ComponentLink1Description=https://ae-bst.resource.bosch.com/media/_tech/media/application_notes/BST-BME680-HS000-05.pdf?src-supplier=Digi-Key, ComponentLink1URL=https://ae-bst.resource.bosch.com/media/_tech/media/application_notes/BST-BME680-HS000-05.pdf?src-supplier=Digi-Key, ComponentLink2Description=https://ae-bst.resource.bosch.com/media/_tech/media/product_flyer/BST-BME680-FL000.pdf?src-supplier=Digi-Key, ComponentLink2URL=https://ae-bst.resource.bosch.com/media/_tech/media/product_flyer/BST-BME680-FL000.pdf?src-supplier=Digi-Key, Item Type="Temperature Sensor", Manufacturer Part Number=BME680, Output Type=SPI,I2C, Pricing 1="1=9.84000, 20=8.81000, 125=8.18000, 500=7.71000, 3000=7.09000 (USD)", RoHS=No, Sensor Type=Temperature, Stock 1=64, Supplier 1="Future Electronics"
U8: "SMD MODULE, ESP32-S3R8 WITH 3.3V", LCSC Part Number=C2913202, Manufacturer="Espressif Systems", Supplier Part Number 1=1965-ESP32-S3-WROOM-1-N16R8CT-ND, Category=Uncategorized, ComponentLink1Description=LCSC, ComponentLink1URL=https://www.lcsc.com/product-detail/WiFi-Modules_Espressif-Systems-ESP32-S3-WROOM-1-N16R8_C2913202.html, Item Type=Module, Manufacturer Part Number=ESP32-S3-WROOM-1-N16R8, Pricing 1="1=4.29000 (USD)", RoHS=No, Stock 1=423, Supplier 1=Digi-Key
U9: "RF Modules ENGINEERING SAMPLE", Manufacturer=Qorvo, Supplier Part Number 1=772-DWM3000-ESSR, ComponentLink1Description=LCSC, ComponentLink1URL=https://eu.mouser.com/ProductDetail/Qorvo/DWM3000-ESSR?qs=DPoM0jnrROUKQ7mLMYYEbQ%3D%3D, Item Type=Module, Manufacturer Part Number=DWM3000-ESSR, Pricing 1="1=24, 10=24, 25=19.44, 50=19.44, 100=14.9, 1000=14.9, 10000=14.9 (USD)", Stock 1=282, Supplier 1=Mouser
U10: "SPI LQFP-48(7x7) Ethernet ICs ROHS", LCSC Part Number=C32843, Manufacturer=WIZNET, Package=LQFP-48(7x7), ComponentLink1Description=LCSC, ComponentLink1URL=https://www.lcsc.com/product-detail/Ethernet-ICs_WIZNET-W5500_C32843.html, Item Type=IC, Manufacturer Part Number=W5500
U11: "TVS DIODE 5.5VWM 8.5VC SOT23-5", Breakdown Voltage=5.5V, Case/Package=SOT-23, Clamping Voltage=7.8V, Clamping Voltage-Max=8V, LCSC Part Number=C10675, Leakage Current=100nA, Manufacturer=Littelfuse, Max Operating Temperature=85°C, Max Power Dissipation=225mW, Min Operating Temperature=-40°C, Power Line Protection=No, Supplier Part Number 1=3283009, Voltage Rating (DC)=5V, Category="TVS Diodes", ComponentLink1Description=https://datasheet.ciiva.com/15143/getdatasheetpartid-152299-15143806.pdf?src-supplier=Verical, ComponentLink1URL=https://datasheet.ciiva.com/15143/getdatasheetpartid-152299-15143806.pdf?src-supplier=Verical, ComponentLink2Description=https://datasheet.ciiva.com/4509/sp05x-leadfree-4509638.pdf?src-supplier=Mouser, ComponentLink2URL=https://datasheet.ciiva.com/4509/sp05x-leadfree-4509638.pdf?src-supplier=Mouser, ComponentLink3Description=https://datasheet.ciiva.com/22697/1911798-22697943.pdf?src-supplier=Element14, ComponentLink3URL=https://datasheet.ciiva.com/22697/1911798-22697943.pdf?src-supplier=Element14, ComponentLink4Description=https://datasheet.ciiva.com/8062/littefuse-spa-sp050x-8062425.pdf?src-supplier=Element14, ComponentLink4URL=https://datasheet.ciiva.com/8062/littefuse-spa-sp050x-8062425.pdf?src-supplier=Element14, ComponentLink5Description=https://datasheet.ciiva.com/332/sp05xxba-332619.pdf?src-supplier=Digi-Key, ComponentLink5URL=https://datasheet.ciiva.com/332/sp05xxba-332619.pdf?src-supplier=Digi-Key, ComponentLink6Description=https://datasheet.ciiva.com/332/sp05xxba-332620.pdf?src-supplier=Digi-Key, ComponentLink6URL=https://datasheet.ciiva.com/332/sp05xxba-332620.pdf?src-supplier=Digi-Key, ComponentLink7Description=https://datasheet.ciiva.com/16393/sp05xxba-16393404.pdf?src-supplier=Future+Electronics, ComponentLink7URL=https://datasheet.ciiva.com/16393/sp05xxba-16393404.pdf?src-supplier=Future+Electronics, ComponentLink8Description=https://datasheet.ciiva.com/332/sp05xxba-332621.pdf?src-supplier=Digi-Key, ComponentLink8URL=https://datasheet.ciiva.com/332/sp05xxba-332621.pdf?src-supplier=Digi-Key, ComponentLink9Description=https://datasheet.ciiva.com/1268/526672-1268494.pdf?src-supplier=Element14, ComponentLink9URL=https://datasheet.ciiva.com/1268/526672-1268494.pdf?src-supplier=Element14, Depth=1.75mm, Diode Type=ZENER, Direction=Unidirectional, ESD Protection=Yes, Height=1.3mm, Item Type="TVS Diode", Lead Free="Lead Free", Length=3.05mm, Manufacturer Part Number=SP0504BAHTG, Max Reverse Leakage Current=100nA, Mounting Technology="Surface Mount", Number of Channels=4, Number of Elements=4, Number of Unidirectional Channels=4, Packaging="Tape and Reel", Peak Pulse Power=225mW, Pins=5, Polarity=Bidirectional,Unidirectional, Power Dissipation=225mW, Pricing 1="1=0.78, 15=0.685, 75=0.625, 300=0.575, 1500=0.52 (USD)", Radiation Hardening=No, Reach SVHC Compliant=Unknown, Reverse Standoff Voltage=5.5V, RoHS=Yes, RoHS Compliant=Yes, Series="SP05, SPA®", Stock 1=1611, Supplier 1="Future Electronics", Termination=SMD/SMT, Width=1.75mm, Working Voltage=5.5V
U12: "IC TRANSLATOR BIDIR 20TSSOP", LCSC Part Number=C17206, Manufacturer="Texas Instruments", Package=20-TSSOP, ComponentLink1Description=LCSC, ComponentLink1URL=https://www.lcsc.com/product-detail/Translators-Level-Shifters_Texas-Instruments-TXS0108EPWR_C17206.html, Item Type=IC, Manufacturer Part Number=TXS0108EPWR
X1: library part Q22FA12800090, "CRYSTAL 25.0000MHZ 12PF SMD", LCSC Part Number=C255883, Manufacturer="Seiko Epson", Package=SMD2016-4P, ComponentLink1Description=LCSC, ComponentLink1URL=https://www.lcsc.com/product-detail/Crystals_Seiko-Epson-Q22FA12800090_C255883.html, Item Type=Crystal, Manufacturer Part Number=Q22FA12800090

## Free pads (board coordinates)
  round 3.2 hole 3.2 unplated: MH0(-16,21) MH0(20,82) MH0(56,21)

## Via types
v1: diameter 0.6, hole 0.3, Top Layer to Bottom Layer, 283 vias

## Nets (pads, with @x,y where several pads share a name; then routed paths per layer and width w, separated by ;. In a path a pad name is that pad's centre, name@x,y a point inside that pad or via, vN(x,y) a via of type N, cw(c..) or ccw(c..) an arc to the next point about the centre after c; other vN are vias at no path point)
1V8_SENSOR: C15.2 C16.2 FB7.1 J2.8 P7.1 U4.5 | length 31.6
  Top Layer w0.33: FB7.1@-6.29,67.285 -2.616,67.285 -1.996,66.665 1.479,66.665 1.845,67.031 1.845,70.965 2.173,71.293 v1(2.193,71.293)
  Top Layer w0.635: P7.1@13.716,69.012 v1(15.164,69.012) C16.2@18.399,69.012
  Bottom Layer w0.635: v1(2.193,71.293) 4.475,69.012 v1(15.164,69.012)
3V3_CLEAN: C12.2 C21.2 C22.2 C23.2 FB2.1 FB3.1 P9.1 U5.5 | length 4.2
  Top Layer w0.381: P9.1@13.716,72.936 16.37,72.936 16.789,73.355 FB3.1@16.789,74.27
3V3_SENSOR: C17.2 FB3.2 J2.9 P8.1 | length 19.2
  Top Layer w0.33: J2.9@2.345,68.092 2.345,69.088
  Top Layer w0.381: 2.345,69.088 2.345,69.514 3.273,70.441 9.913,70.441 10.922,71.45 10.922,74.556 11.614,75.248 P8.1@13.716,75.248 C17.2@15.926,75.248
+3V3: C8.1 C26.2 C27.2 C30.2 C31.2 C35.1 C36.2 FB8.1 J2.1 J4.1 P6.1 Q2.1 Q4.2 R9.2 R14.1 R15.1 R17.2 R18.1 R21.2 R23.2 R24.2 R27.1 R28.1 U3.3 U7.2 U7.5 U7.6 U7.8 U8.2 U9.5 U9.6 U9.7 | length 62.3
  Top Layer w0.305: U7.6@-8.649,12.081 -8.066,12.664 -8.066,13.795 U7.2@-7.518,14.343
  Top Layer w0.508: v1(-27.374,37.313) -27.358,37.328 -27.358,38.211 C30.2@-27.342,38.227 ; J4.1@-25.952,68.857 -25.952,68.854 -25.044,67.947 v1(-25.044,67.945) ; -16.579,37.871 R24.2@-15.944,37.871 -15.876,37.939 -14.915,37.939 v1(-14.897,37.957) ; v1(-11.416,66.477) FB8.1@-11.416,67.279 ; R15.1@6.35,96.825 v1(7.175,96.825) ; R14.1@10.1,96.825 v1(10.95,96.825) ; v1(16.256,29.119) R18.1@16.256,28.397 16.256,28.359 16.58,28.035 16.58,27.404 Q2.1@16.736,27.248 ; v1(48.131,71.189) 48.131,68.103 48.602,67.633 P6.1@50.569,67.633 ; R9.2@49.121,28.926 v1(49.121,29.896)
  PWR w0.508: v1(-11.138,12.249) -10.093,13.294 ; v1(-9.214,10.296) -8.644,10.866 -8.644,11.845 -10.093,13.294 ; -6.471,24.61 -6.471,16.916 -10.093,13.294
  Bottom Layer w0.508: v1(-3.785,92.583) v1(-3.785,93.726) 1.905,93.726 5.004,96.825 v1(7.175,96.825) v1(10.95,96.825) ; v1(49.121,29.896) 52.248,29.896 53.526,31.174 53.526,35.339 v1(53.543,35.357)
  other v1: 34.88,5.337 49.431,18.798 50.114,19.482 53.543,37.008 61.976,58.75 19.834,62.795 19.837,64.364 -2.946,68.377 44.372,71.189 45.625,71.189 46.878,71.189 44.372,74.085 45.625,74.085 46.878,74.085 48.131,74.085
+5V: C9.1 C10.2 C18.2 C25.2 C32.1 D4.1 FB4.1 L2.1 LED1.1 P5.1 Q1.2 R19.1 U3.2 | length 17.6
  Top Layer w0.381: C25.2@3.576,96.701 3.579,96.704 3.579,97.635 v1(3.581,97.638) ; R19.1@19.609,26.187 21.653,26.187 22.149,26.684 v1(22.149,28.778) C32.1@22.149,29.469 LED1.1@19.703,29.469 LED1.1@19.609,29.375
  Top Layer w0.508: 41.628,80.993 41.641,80.981 P5.1@50.162,80.981
  other v1: 39.596,77.996 42.923,77.996 39.596,79.139 40.637,79.139 41.78,79.139 42.923,79.139 39.596,80.181 40.637,80.181 41.78,80.181 42.923,80.181
+5VP: F1.2 P2.1 Q1.3 | length 3.8
  Top Layer w0.508: P2.1@33.119,67.633 35.938,67.633 36.163,67.408 36.59,67.408 Q1.3@36.746,67.252
A1: J2.2 U12.1 | length 6.1
  Top Layer w0.33: U12.1@-6.05,69.514 -1.581,69.514 -1.155,69.088 J2.2@-1.155,68.092
A2: J2.3 U12.3 | length 7.7
  Top Layer w0.33: U12.3@-6.05,70.814 -1.422,70.814 -0.655,70.046 J2.3@-0.655,68.092
A3: J2.4 U12.4 | length 8.7
  Top Layer w0.305: U12.4@-6.05,71.464 -1.121,71.464 -0.155,70.498 J2.4@-0.155,68.092
A4: J2.5 U12.5 | length 9.7
  Top Layer w0.305: U12.5@-6.05,72.114 -0.876,72.114 0.345,70.892 J2.5@0.345,68.092
A5: J2.6 U12.6 | length 10.7
  Top Layer w0.33: U12.6@-6.05,72.764 -0.679,72.764 0.845,71.239 J2.6@0.845,68.092
A6: J2.7 U12.7 | length 11.7
  Top Layer w0.33: U12.7@-6.05,73.414 -0.42,73.414 1.345,71.649 J2.7@1.345,68.092
A7: U12.8
A8: U12.9
B1: P22.1 U8.18 U12.20 | length 42.3
  Top Layer w0.345: v1(-22.593,57.048) -22.593,55.104 -21.81,54.321 -15.381,54.321 -14.224,53.164 -14.224,48.057 -13.149,46.981 U8.18@-10.884,46.981 ; v1(-12.997,69.52) -12.994,69.517 -11.653,69.517 U12.20@-11.65,69.514
  Bottom Layer w0.345: v1(-22.593,57.048) -22.593,67.638 -20.711,69.52 v1(-16.434,69.52) v1(-12.997,69.52)
B2: P18.1 U8.12 U9.20 U12.18 | length 163.1
  Top Layer w0.345: v1(-14.326,73.635) -15.068,72.892 -15.068,65.379 -13.498,63.809 -10.681,63.809 -5.48,58.609 -5.48,53.164 -8.045,50.599 -8.045,38.569 -8.742,37.871 -13.784,37.871 -14.674,38.761 U8.12@-14.674,41.401 -14.674,43.811 -14.086,44.399 v1(-12.421,44.399) ; U12.18@-11.65,70.814 v1(-10.183,70.814) ; P18.1@-10.008,34.544 v1(-5.973,34.544) ; v1(59.577,47.267) 62.877,47.267 63.777,46.367 U9.20@63.777,43.572
  Bottom Layer w0.345: v1(-14.326,73.635) -11.582,73.635 -10.183,72.235 v1(-10.183,70.814) ; v1(-12.421,44.399) -7.323,44.399 -5.973,43.049 v1(-5.973,34.544) 15.762,34.544 26.354,45.136 58.942,45.136 59.577,45.771 v1(59.577,47.267)
B3: P16.1 U8.7 U9.18 U12.17 | length 173.3
  Top Layer w0.345: v1(-21.024,43.358) U8.7@-21.024,41.401 -21.024,38.114 P16.1@-17.454,34.544 -17.454,35.937 -16.939,36.452 -8.33,36.452 -6.909,37.874 -6.909,49.937 -4.281,52.564 -4.281,59.253 -10.15,65.122 -12.607,65.122 -13.765,66.28 -13.765,70.735 -13.036,71.464 U12.17@-11.65,71.464 ; U9.18@60.977,43.572 60.977,45.229 v1(61.519,45.771)
  Bottom Layer w0.345: v1(-21.024,43.358) -21.024,53.178 -14.592,59.609 25.73,59.609 28.275,57.065 59.318,57.065 61.519,54.864 v1(61.519,45.771)
B4: P14.1 U8.6 U9.19 U12.16 | length 179
  Top Layer w0.345: v1(-22.294,43.358) U8.6@-22.294,41.401 -22.294,36.913 P14.1@-19.925,34.544 -18.579,33.198 -16.79,33.198 -16.205,33.783 -16.205,35.316 -15.649,35.872 -8.033,35.872 -6.305,37.599 -6.305,49.585 -3.69,52.2 -3.69,59.589 -9.449,65.349 -9.449,71.379 -10.183,72.114 U12.16@-11.65,72.114 ; U9.19@62.377,43.572 62.377,45.271 v1(62.877,45.771)
  Bottom Layer w0.345: v1(-22.294,43.358) -22.294,53.168 -15.097,60.365 58.744,60.365 62.275,56.835 62.275,46.373 v1(62.877,45.771)
B5: U8.22 U12.15 | length 38.3
  Top Layer w0.345: v1(-16.053,67.585) -16.053,65.25 -13.973,63.17 -10.957,63.17 -6.125,58.338 -6.125,53.483 -7.547,52.061 U8.22@-10.884,52.061 ; U12.15@-11.65,72.764 v1(-9.449,72.764)
  Bottom Layer w0.345: v1(-16.053,67.585) -11.112,67.585 -9.449,69.248 v1(-9.449,72.764)
B6: U8.8 U12.14 | length 60.1
  Top Layer w0.345: U8.8@-19.754,41.401 -19.754,38.499 -18.28,37.025 -8.667,37.025 -7.476,38.217 -7.476,50.249 -4.881,52.844 -4.881,58.962 -10.362,64.443 -13.057,64.443 -14.405,65.792 -14.405,72.209 -13.2,73.414 U12.14@-11.65,73.414
B7: U12.13
B8: U12.12
DCDC_POK: R9.1 U1.7 | length 1.6
  Top Layer w0.508: U1.7@46.622,28.926 R9.1@48.182,28.926
ESP_EN: C33.2 J4.6 R17.1 U8.3 | length 37.9
  Top Layer w0.343: v1(-26.096,42.659) -26.096,41.409 U8.3@-26.104,41.401 -25.825,41.123 -25.825,40.456 -25.321,39.953 -25.321,39.426 R17.1@-25.291,39.395 C33.2@-25.291,38.227 ; v1(-23.347,73.324) J4.6@-22.416,72.392
  Bottom Layer w0.343: v1(-26.096,42.659) -26.096,70.575 v1(-23.347,73.324)
GND: C2.2 C5.2 C6.1 C7.1 C8.2 C9.2 C10.1 C11.2 C12.1 C13.1 C14.1 C15.1 C16.1 C17.1 C18.1 C19.1 C20.1 C21.1 C22.1 C23.1 C24.1 C25.1 C26.1 C27.1 C28.1 C30.1 C31.1 C32.2 C33.1 C34.1 C35.2 C37.1 C38.1 C39.1 C40.1 C41.1 C42.1 C43.1 C44.1 C45.1 C48.1 C49.2 C50.1 C51.1 C52.1 C53.1 C54.1 C55.1 C56.1 D3.1 D5.1 J1.A1/B12 J1.B1/A12 J2.13 J2.14 J3.2 J4.2 J5.7 LED1.3 LED2.2 P10.1 Q3.2 R3.1 R8.1 R10.1 R11.1 R12.1 R13.2 R25.1 R44.1 RN2.3 RN2.4 RN3.1 RN3.2 RN3.3 RN3.4 SW1.2 U1.4 U2.5 U3.1 U4.2 U5.2 U7.1 U7.7 U8.1 U8.40 U8.41 U9.8 U9.16 U9.21 U9.23 U9.24 U10.3 U10.9 U10.14 U10.16 U10.19 U10.29 U10.48 U11.2 U12.11 X1.2 X1.4 | length 109.3
  Top Layer w0.254: LED1.3@18.403,30.669 18.403,31.395 18.733,31.725 21.862,31.725 v1(22.149,31.438) C32.2@22.149,30.409
  Top Layer w0.305: U7.7@-9.215,12.646 -8.786,13.075 -8.786,14.207 U7.1@-8.084,14.909 ; U10.48@4.79,40.128 4.792,40.13 v1(5.891,40.13) ; v1(6.95,35.738) C40.1@7.541,35.738 ; U10.3@7.29,38.628 v1(7.29,39.822) ; C41.1@9.79,35.966 9.804,35.953 9.804,35.482 v1(9.817,35.468) ; v1(9.79,46.073) U10.29@9.79,47.128 ; U10.9@10.29,38.628 v1(10.29,39.822) ; C39.1@11.242,48.589 v1(11.242,49.378) ; v1(11.534,42.469) 12.193,43.128 U10.19@13.29,43.128 ; C42.1@11.79,35.738 v1(12.395,35.738) ; v1(12.167,41.631) 12.168,41.629 U10.16@13.29,41.628 U10.16@13.29,41.628 ; U10.14@13.29,40.628 14.15,40.628 14.514,40.264 14.602,40.264 C43.1@14.679,40.188 v1(15.39,40.188) ; C44.1@16.101,44.128 v1(16.789,44.128) ; C45.1@16.203,46.518 v1(16.203,47.447) ; C51.1@19.174,43.128 C50.1@19.174,45.288
  Top Layer w0.381: U8.1@-28.644,41.401 -28.635,41.41 -28.644,41.419 v1(-28.644,42.977) ; v1(-28.644,57.353) U8.40@-28.644,58.901 ; J4.2@-25.244,69.564 -25.244,69.555 -24.361,68.671 v1(-24.361,68.662) ; v1(-12.344,68.377) C56.1@-11.65,68.377 ; U12.11@-11.65,75.364 v1(-10.183,75.364) ; LED2.2@-7.727,56.796 v1(-6.907,56.796) ; C55.1@-6.05,68.377 v1(-5.333,68.377) ; v1(10.452,54.305) C53.1@11.302,54.305 ; C52.1@11.087,51.14 v1(11.901,51.14) ; v1(11.901,51.14) X1.2@11.902,52.206 ; P10.1@13.716,77.483 15.295,77.483 15.866,76.911 v1(15.926,76.911) ; C16.1@18.399,69.952 v1(18.399,70.562) ; v1(18.716,73.355) 18.718,73.353 18.718,72.633 C12.1@18.72,72.631 ; C38.1@19.313,54.153 19.313,54.096 C38.1@19.504,53.905 ; C37.1@19.313,55.478 19.631,55.795 C37.1@19.745,55.795 19.991,55.795 C37.1@20.308,55.478 ; C15.1@19.516,69.952 v1(19.516,70.562) ; v1(21.735,53.743) Q3.2@22.672,53.743 ; C14.1@24.562,69.952 v1(24.562,70.562) ; C13.1@25.845,69.952 v1(25.845,70.562) ; SW1.2@33.303,2.725 33.303,4.706 v1(33.903,5.306) ; C34.1@38.442,4.42 v1(38.442,5.306) ; R10.1@44.678,67.834 45.584,67.834 v1(45.585,67.833)